# Altium PCB DC Load Control Board.PcbDoc (part 1 of 2)
Units mm, origin at the board's own origin, x right, y up, seen from the top; angles counter-clockwise.
Board outline 70 x 74.5 mm, 4 copper layers (Top Layer, Layer 1, Layer 2, Bottom Layer), stack 0.603 mm thick; 93 components, 78 nets, 360 pads, 209 vias.
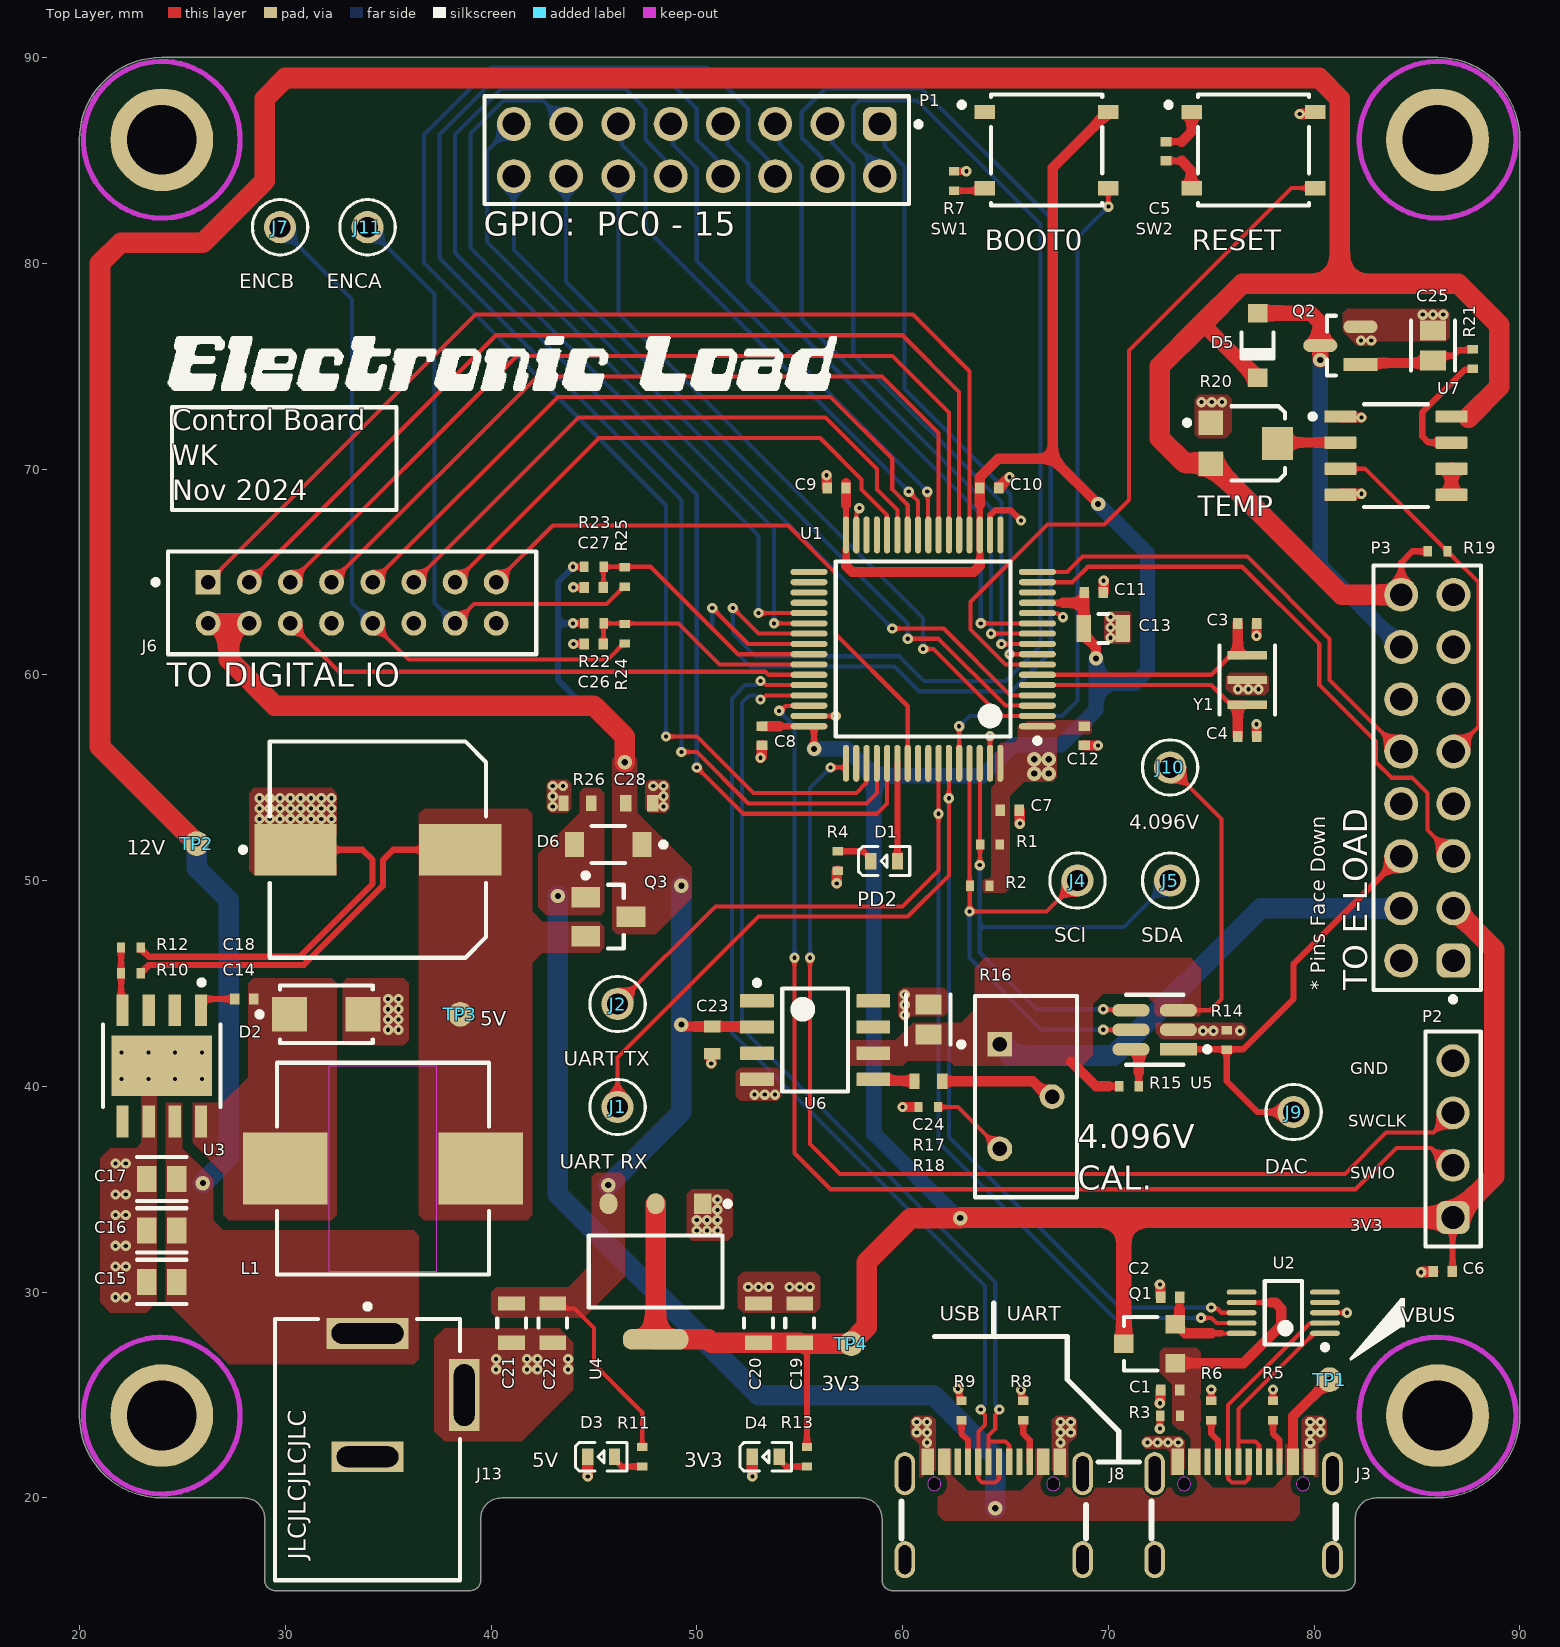
[diagram p0: Top Layer view]
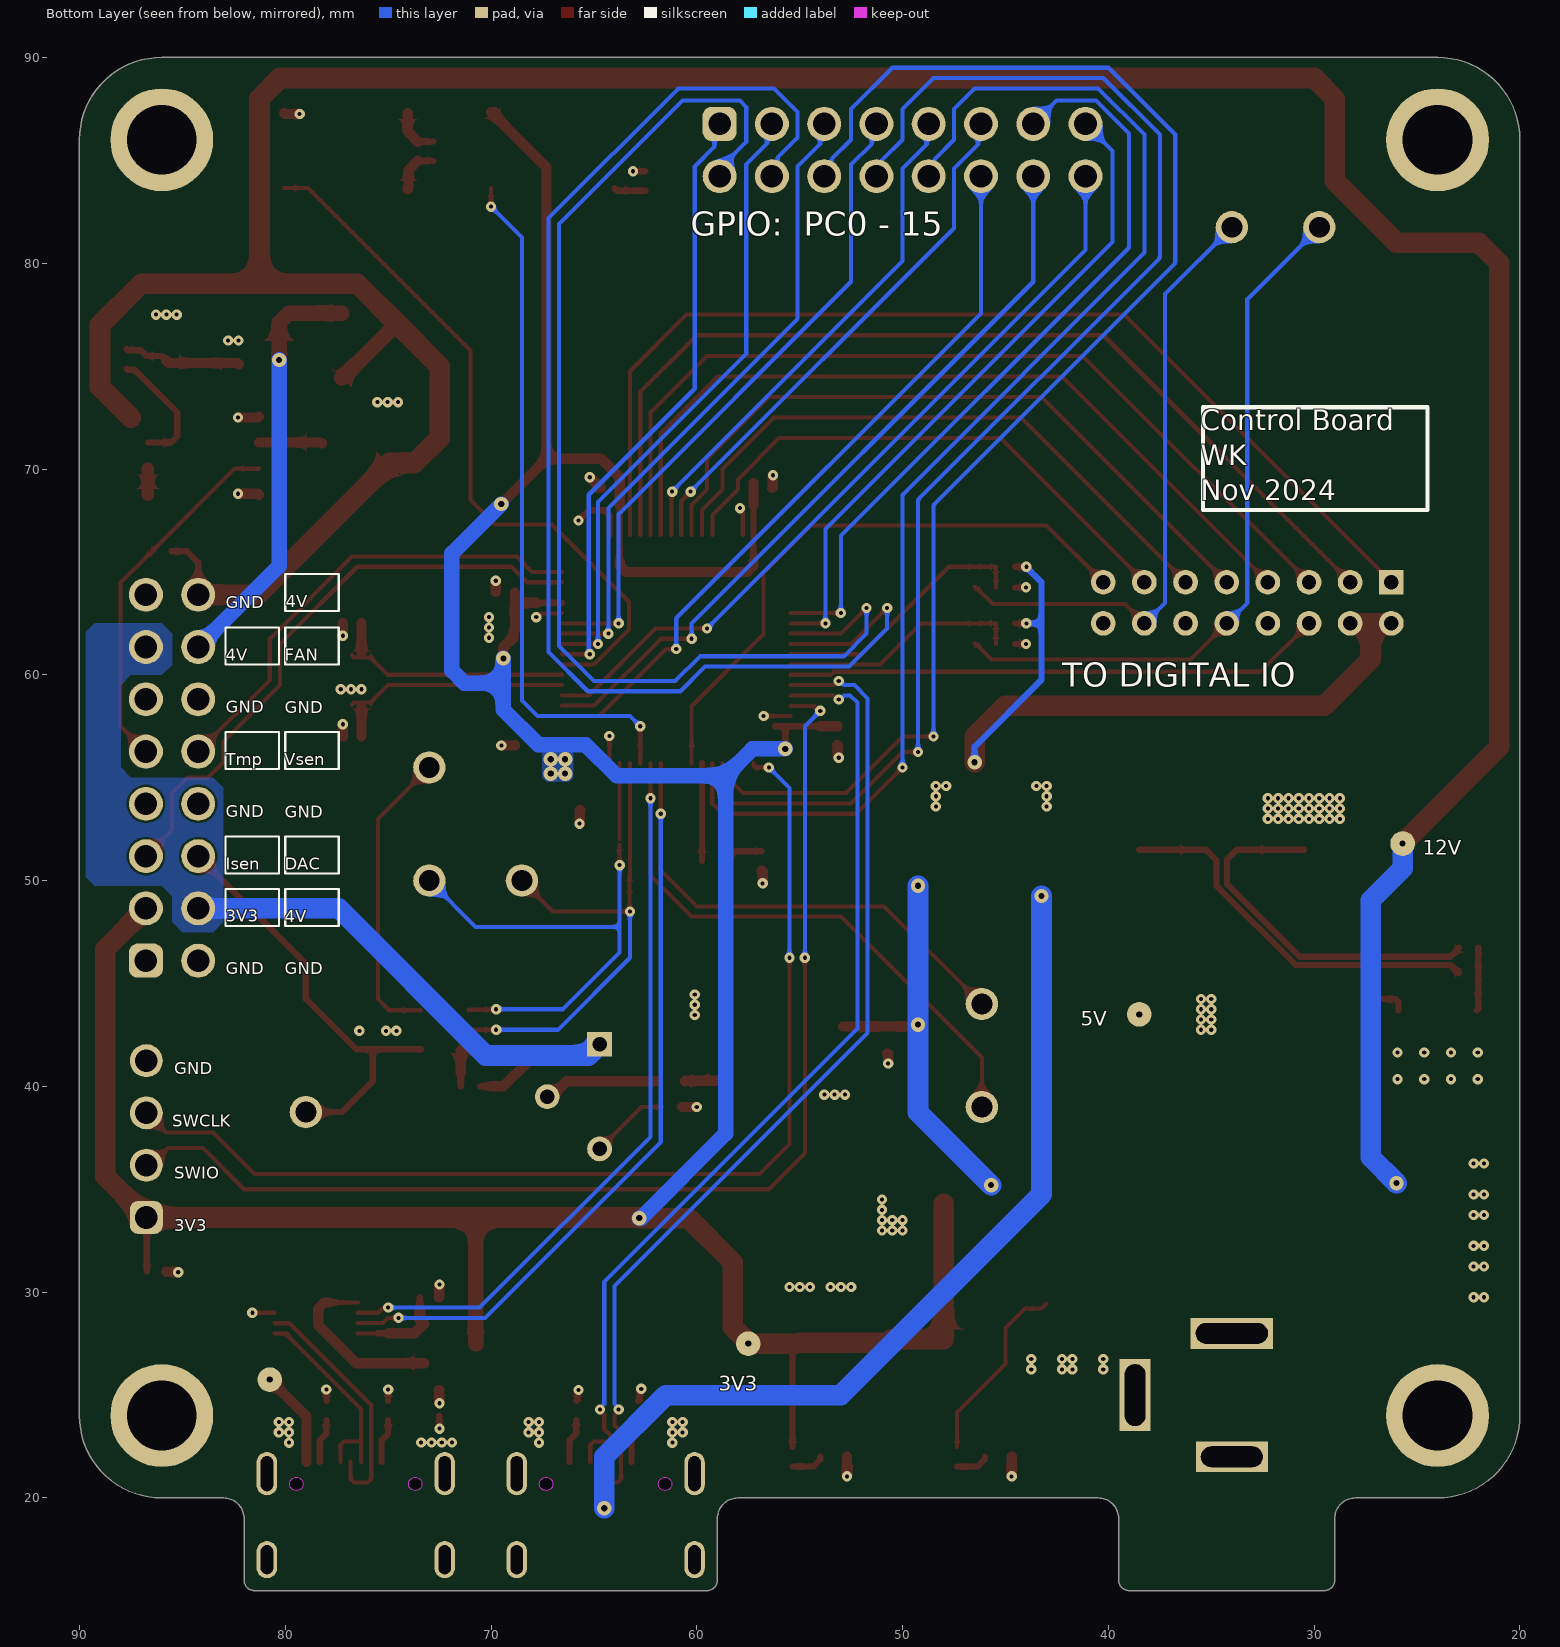
[diagram p1: Bottom Layer view, seen from below]
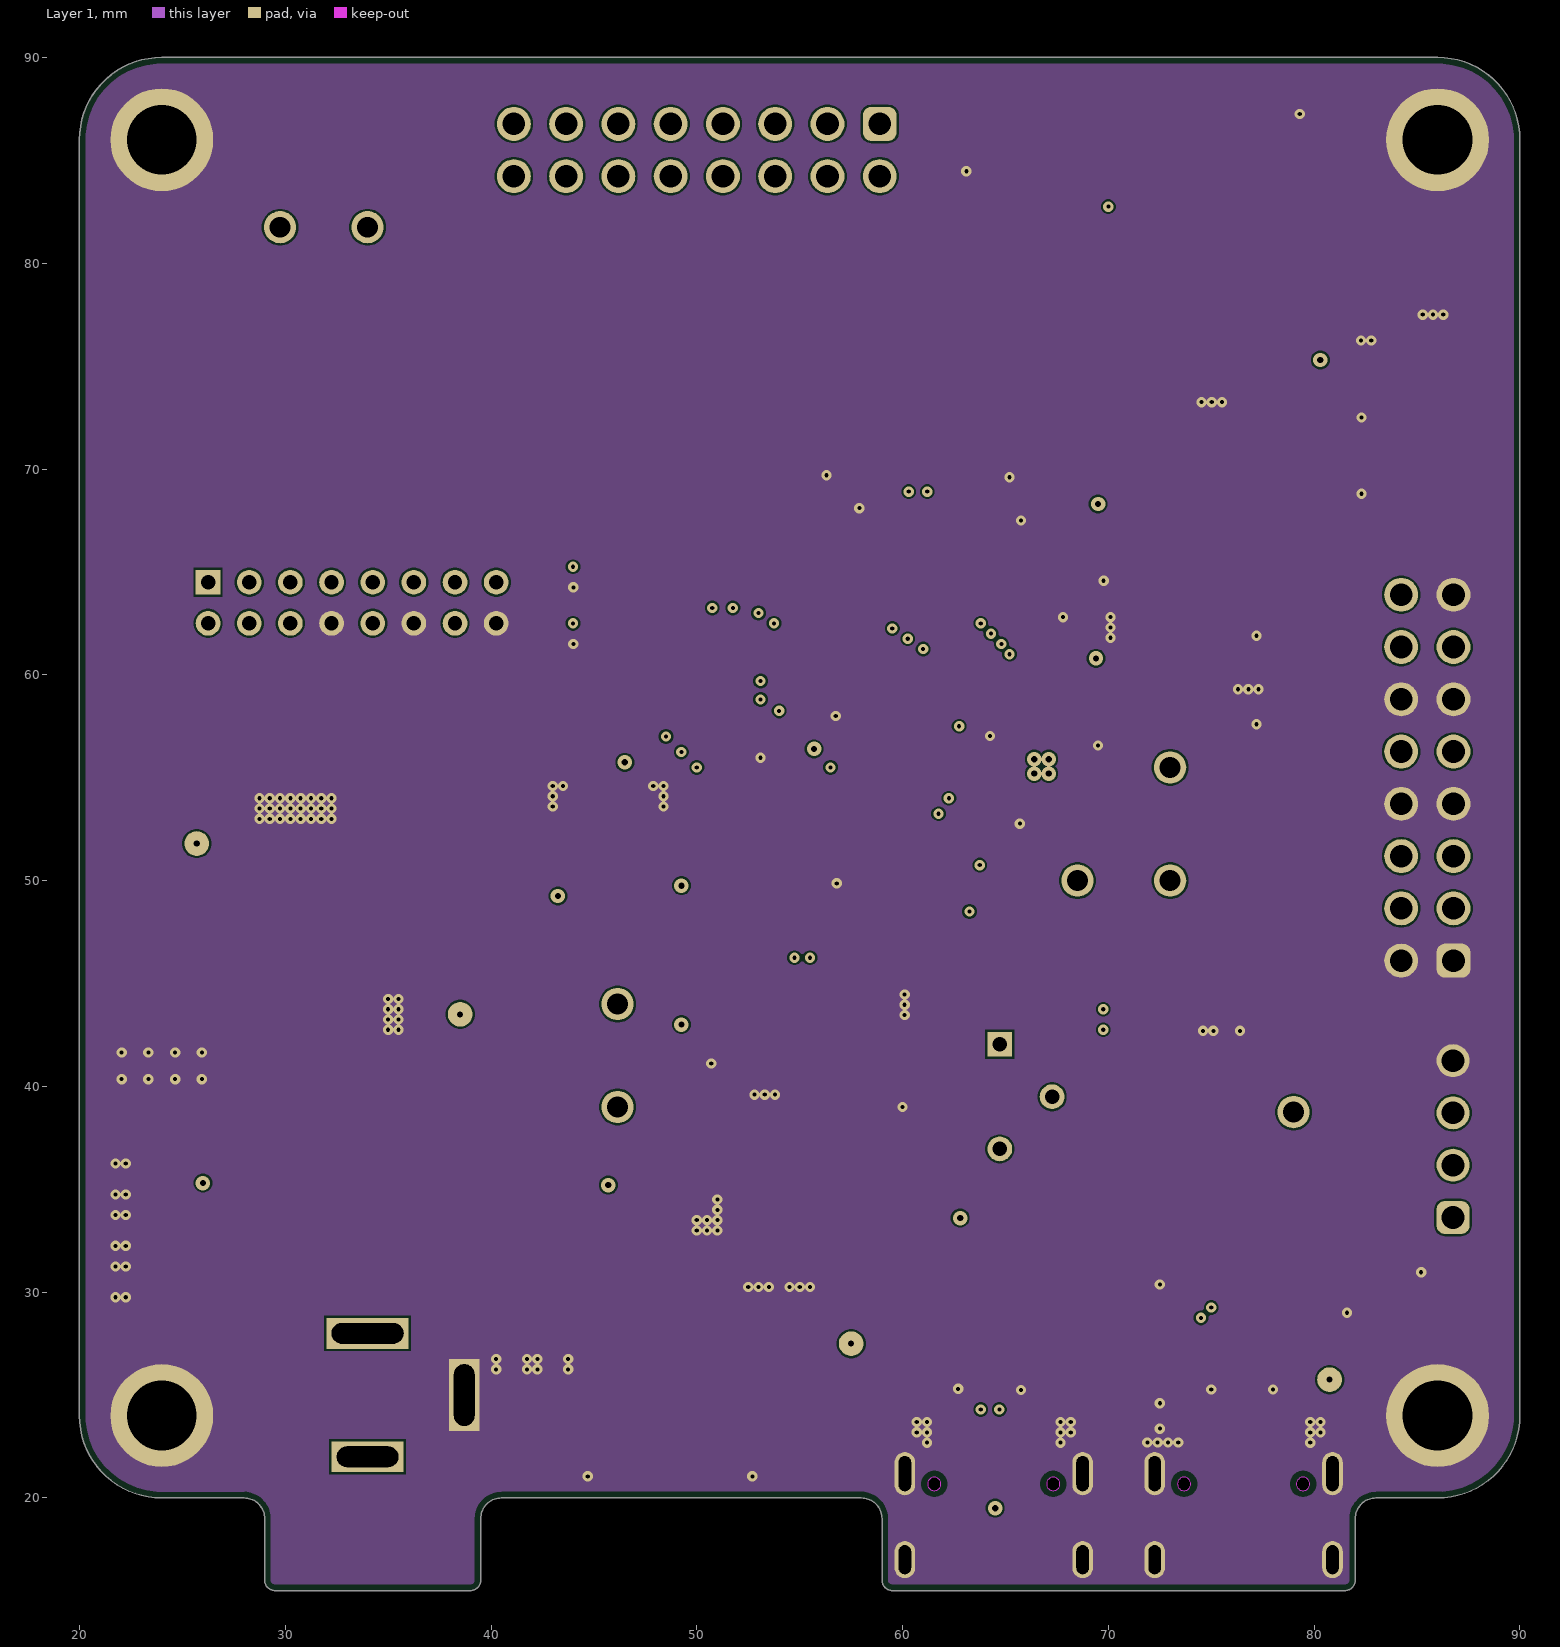
[diagram p2: Layer 1]
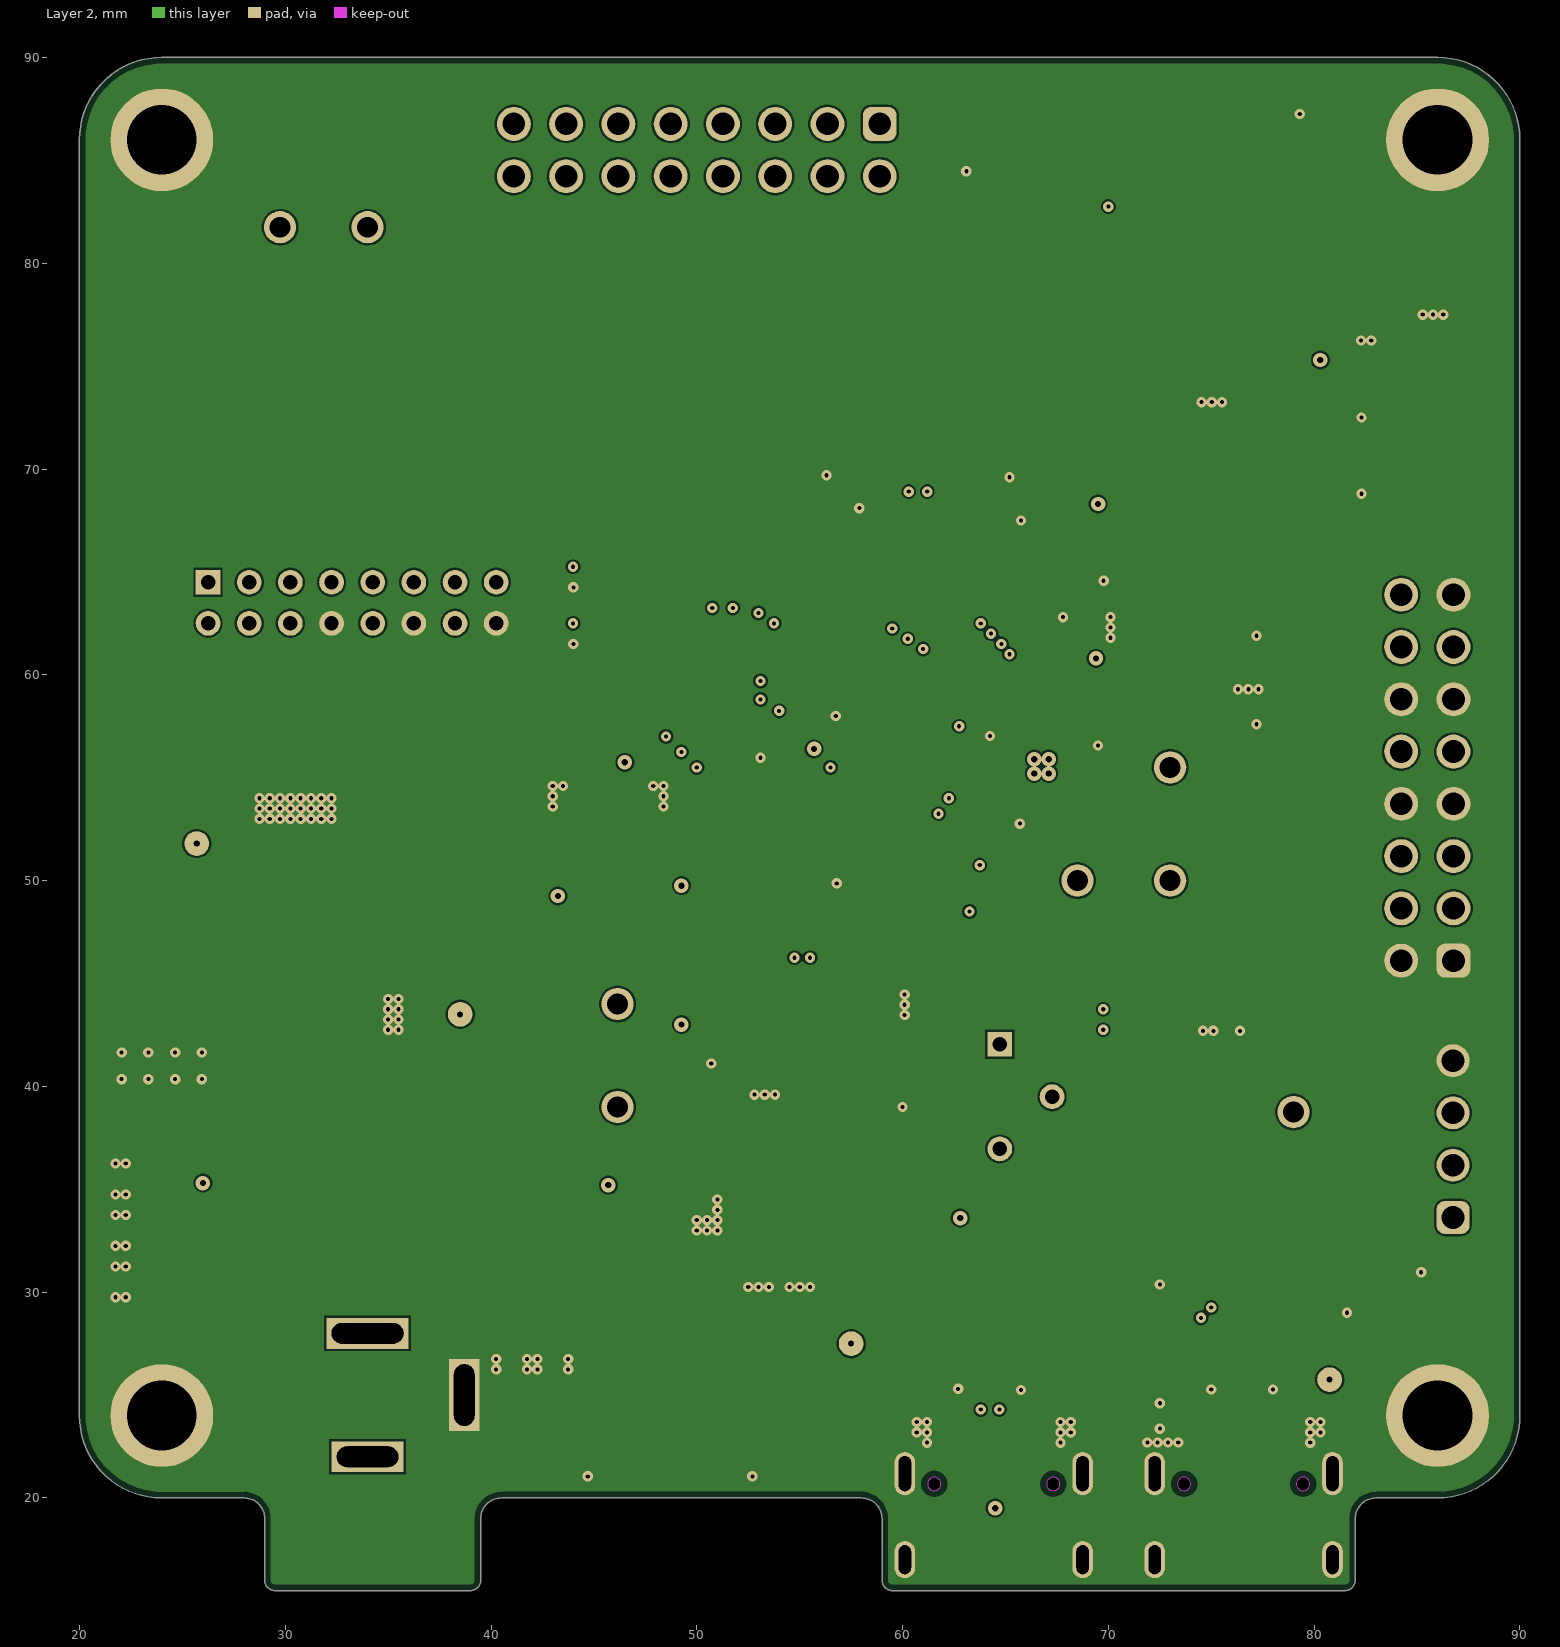
[diagram p3: Layer 2]

## Layer stack, top to bottom
Top Solder: solder mask 0.0102, Solder Resist, Dk 3.5
Top Layer: signal copper 0.0356
Dielectric 2: prepreg 0.0711, PP-006, Dk 4.1
Layer 1: signal copper 0.035
Dielectric 1: dielectric 0.32, FR-4, Dk 4.8
Layer 2: signal copper 0.035
Dielectric 3: prepreg 0.0711, PP-006, Dk 4.1
Bottom Layer: signal copper 0.0356
Bottom Solder: solder mask 0.0102, Solder Resist, Dk 3.5

## Board outline
29,19 29,16 ccw(c29.5,16) 29.5,15.5 39,15.5 ccw(c39,16) 39.5,16 39.5,19 cw(c40.5,19) 40.5,20 58,20 cw(c58,19) 59,19 59,16 ccw(c59.5,16) 59.5,15.5 81.5,15.5 ccw(c81.5,16) 82,16 82,19 cw(c83,19) 83,20 86,20 ccw(c86,24) 90,24 90,86 ccw(c86,86) 86,90 24,90 ccw(c24,86) 20,86 20,24 ccw(c24,24) 24,20 28,20 cw(c28,19)

## Design rules (kind name [scope] priority, off if disabled: settings)
BoardOutlineClearance [All] p1: gap=0.3 ignorepadtopadclearanceinfootprint=FALSE
Clearance [All] p1: gap=0.1 ignorepadtopadclearanceinfootprint=FALSE except(0.3: Fill-Fill Fill-Poly Fill-Region Poly-Poly Poly-Region Region-Region)
DiffPairsRouting [All] p1: maxlimit=0.3 minlimit=0.1 mostfreqgap=0.2 toplayer_minwidth=0.1 toplayer_maxwidth=0.381 toplayer_prefwidth=0.3 midlayer1_minwidth=0.1 midlayer1_maxwidth=0.381 midlayer1_prefwidth=0.3 midlayer2_minwidth=0.1 midlayer2_maxwidth=0.381 midlayer2_prefwidth=0.3 bottomlayer_minwidth=0.1 bottomlayer_maxwidth=0.381 bottomlayer_prefwidth=0.3 maxuncoupledlength=12.7
HoleSize [All] p1: absolutevalues=TRUE maxlimit=5 minlimit=0.025 maxpercent=80.000 minpercent=20.000
MinimumSolderMaskSliver [All] p1: minsoldermaskwidth=0.025
PlaneClearance [All] p1: clearance=0.1
PlaneConnect [All] p1: planeconnectstyle=Direct reliefexpansion=0.508 reliefentries=4 reliefconductorwidth=0.254 reliefairgap=0.254
PolygonConnect [All] p1: connectstyle=Direct reliefconductorwidth=0.254 reliefentries=4 polygonreliefangle="90 Angle" airgapwidth=0.254
RoutingVias [All] p1: holewidth=0.711 width=1.27 viastyle="Through Hole" minholewidth=0.711 minwidth=1.27 maxholewidth=0.711 maxwidth=1.27
SilkToSilkClearance [All] p1: silktosilkclearance=0
SilkToSolderMaskClearance [IsPad] p1: minsilkscreentomaskgap=0.1 clearancetoexposedcopper=TRUE
SolderMaskExpansion [All] p1: expansion=0.102 istentingtop=FALSE
SupplyNets "Schematic Supply Nets_4" [InNet('5V_Sel')] p1: voltage=0.000
SupplyNets "Schematic Supply Nets_6" [InNet('+5 USB')] p2: voltage=0.000
SupplyNets "Schematic Supply Nets_5" [InNet('GND')] p3: voltage=0.000
SupplyNets "Schematic Supply Nets_3" [InNet('+4.096V')] p4: voltage=0.000
SupplyNets "Schematic Supply Nets_2" [InNet('+5V')] p5: voltage=0.000
SupplyNets "Schematic Supply Nets_1" [InNet('+12V')] p6: voltage=0.000
SupplyNets "Schematic Supply Nets" [InNet('+3V3')] p7: voltage=0.000
Width [All] p1: maxlimit=5 minlimit=0.1 preferedwidth=0.2
23 further rules are at their usual default settings.

## Classes and differential pairs
component class Top: J13 P3
component class "U_Digital IO": C26 C27 J6 J7 J11 R22 R23 R24 R25
differential pair class USB2D: USB2D
differential pair class USB1D: USB1D
component class "U_Power Distribution": C14 C15 C16 C17 C18 C19 C20 C21 C22 C28 D2 D3 D4 D6 L1 Q3 R10 R11 R12 R13 R26 TP2 TP3 TP4 U3 U4
component class U_Microcontroller: C1 C2 C3 C4 C5 C6 C7 C8 C9 C10 C11 C12 C13 D1 J1 J2 J3 J4 J5 J8 P1 P2 Q1 R1 R2 R3 R4 R5 R6 R7 R8 R9 SW1 SW2 TP1 U1 U2 Y1
component class U_Thermal: C25 D5 Q2 R19 R20 R21 U7
component class U_DAC: C23 C24 J9 J10 R14 R15 R16 R17 R18 U5 U6
differential pair USB2D: +USB2D_P -USB2D_N
differential pair USB1D: +USB1D_P -USB1D_N

## Components (designator, comment, footprint, x,y, rotation, side; value= is the part's Value field where it differs from the comment)
C1 "100nF" "IPC C C0402 NO SILK" 73,25.25 r180 top
C2 "100nF" "IPC C C0402 NO SILK" 73,29.75 r0 top
C3 "10pF" "IPC C C0402 NO SILK" 76.75,62.5 r180 top
C4 "10pF" "IPC C C0402 NO SILK" 76.75,57 r180 top
C5 "100nF" "IPC C C0402 NO SILK" 72.8,85.45 r270 top
C6 "100nF" "IPC C C0402 NO SILK" 86.25,31 r180 top
C7 "100nF" "IPC C C0402 NO SILK" 65.21,53.42 r0 top
C8 "100nF" "IPC C C0402 NO SILK" 53.17,57.04 r270 top
C9 "100nF" "IPC C C0402 NO SILK" 56.79,69.08 r180 top
C10 "100nF" "IPC C C0402 NO SILK" 64.21,69.08 r0 top
C11 "100nF" "IPC C C0402 NO SILK" 69.29,64 r0 top
C12 "100nF" "IPC C C0402 NO SILK" 68.83,57.04 r270 top
C13 "10uF" FP-GCM21B-0_15-MFG 69.75,62.25 r0 top
C14 "10nF" "IPC C C0402 NO SILK" 28,44.25 r0 top
C15 "10uF" FP-GRM21B-0_1-IPC_C 24,30.5 r180 top
C16 "10uF" FP-GRM21B-0_1-IPC_C 24,33 r180 top
C17 "10uF" FP-GRM21B-0_1-IPC_C 24,35.5 r180 top
C18 "220uF" FP-UCW1H221MNL1GS-MFG 34.5,51.5 r0 top
C19 "22uF" FP-GRM21B-0_15-MFG 55,28.5 r90 top
C20 "22uF" FP-GRM21B-0_15-MFG 53,28.5 r90 top
C21 "22uF" FP-GRM21B-0_15-MFG 41,28.5 r270 top
C22 "22uF" FP-GRM21B-0_15-MFG 43,28.5 r270 top
C23 "1uF" "IPC C C0603 NO SILK" 50.75,42.25 r90 top
C24 "10uF" FP-GRM21B-0_1-IPC_C 61.25,43.25 r90 top
C25 "10uF" FP-GRM21B-0_1-IPC_C 85.775,76 r90 top
C26 "0.01uF" "IPC C C0402 NO SILK" 45,61.5 r180 top
C27 "0.01uF" "IPC C C0402 NO SILK" 45,64.25 r180 top
C28 "10uF" "IPC C C0603 NO SILK" 47.2,53.75 r180 top
D1 "CMP-006-000001-1" "IPC C D0603" 59.1,50.95 r180 top
D2 "SSA34-E3/61T" FP-95400-MFG 32,43.5 r0 top
D3 "Generic LED 0603" "IPC C D0603" 45.35,22 r180 top
D4 "Generic LED 0603" "IPC C D0603" 53.35,22 r180 top
D5 "1N4148W-7-F" DIOD-SOD123-2_V 77.25,76 r270 top
D6 "MBR0540" FP-425-04-MFG 45.7,51.75 r180 top
J1 "5001" FP-5001-MFG 46.15,39 r0 top
J2 "5001" FP-5001-MFG 46.15,44 r0 top
J3 "USB-TYPE-C-019" USB-TYPE-C-12+4P 76.57,19.379 r0 top
J4 "5001" FP-5001-MFG 68.5,50 r0 top
J5 "5001" FP-5001-MFG 73,50 r0 top
J6 "B16B-PHDSS(LF)(SN)" FP-B16B-PHDSS_LF_SN-MFG 33.25,63.5 r180 top
J7 "5001" FP-5001-MFG 29.75,81.75 r0 top
J8 "USB-TYPE-C-019" USB-TYPE-C-12+4P 64.43,19.379 r0 top
J9 "5001" FP-5001-MFG 79,38.75 r0 top
J10 "5001" FP-5001-MFG 73,55.5 r0 top
J11 "5001" FP-5001-MFG 34,81.75 r0 top
J13 "PJ-002A" CUI-PJ-002A_V 34,25 r270 top
L1 "33uH 1040" WE-LHMI_1040 1304.75,1306 r0 top
P1 "61301621121" 61301621121 50,85.5 r180 top
P2 "61300411121" 61300411121 86.75,37.44 r90 top
P3 "61301621121" 61301621121 85.5,55 r90 top
Q1 "AO3400" AO-SOT23-3_V 72,27.5 r90 top
Q2 "MMBT2222A-7-F" FP-SOT23-IPC_A 81.275,76 r180 top
Q3 "FDV304P" FAIR-SOT23-3_V 45.7,48.25 r0 top
R1 "10K" "IPC C R0402 NO SILK" 64.25,51.75 r0 top
R2 "10K" "IPC C R0402 NO SILK" 63.75,49.75 r0 top
R3 "10K" "IPC C R0402 NO SILK" 73,24 r0 top
R4 "1K" "IPC C R0402 NO SILK" 56.85,50.95 r90 top
R5 "5.1K" "IPC C R0402 NO SILK" 78,24.25 r270 top
R6 "5.1K" "IPC C R0402 NO SILK" 75,24.25 r270 top
R7 "10K" "IPC C R0402 NO SILK" 62.5,84 r270 top
R8 "5.1K" "IPC C R0402 NO SILK" 65.86,24.25 r270 top
R9 "5.1K" "IPC C R0402 NO SILK" 62.86,24.25 r270 top
R10 "10K" "IPC C R0402 NO SILK" 22.5,45.5 r0 top
R11 "3.16K" "IPC C R0402 NO SILK" 47.35,22 r90 top
R12 "3.16K" "IPC C R0402 NO SILK" 22.5,46.75 r180 top
R13 "3.16K" "IPC C R0402 NO SILK" 55.35,22 r90 top
R14 "10K" "IPC C R0402 NO SILK" 75.75,42.25 r270 top
R15 "4K7" "IPC C R0402 NO SILK" 71,40 r180 top
R16 "Ref" FP-3296Y-MFG 66,39.5 r180 top
R17 "470K" "IPC C R0603 NO SILK" 61.25,40.25 r0 top
R18 "1K" "IPC C R0402 NO SILK" 61.25,39 r0 top
R19 "470" "IPC C R0402 NO SILK" 86,66 r0 top
R20 "TC33X-2-103E" BOUR-TC33X-2_V 76.775,71.25 r0 top
R21 "470" "IPC C R0402 NO SILK" 87.7,75.35 r90 top
R22 "10K" "IPC C R0402 NO SILK" 45,62.5 r0 top
R23 "10K" "IPC C R0402 NO SILK" 45,65.25 r0 top
R24 "10K" "IPC C R0402 NO SILK" 46.5,62 r270 top
R25 "10K" "IPC C R0402 NO SILK" 46.5,64.75 r270 top
R26 "100K" "IPC C R0603 NO SILK" 44.2,53.75 r0 top
SW1 "C318884" FP-PTS526SK15SMTR2LFS-MFG 67,85.5 r0 top
SW2 "C318884" FP-PTS526SK15SMTR2LFS-MFG 77.05,85.5 r0 top
TP1 "TP1" TP1 80.75,25.75 r90 top
TP2 "TP1" TP1 25.7,51.8 r90 top
TP3 "TP1" TP1 38.5,43.5 r90 top
TP4 "TP1" TP1 57.5,27.5 r90 top
U1 "STM32F103RET6" STM-LQFP64_N 61,61.25 r180 top
U2 "CH340E" MSOP-UN10_L 78.5,29 r180 top
U3 "TPS5430DDA" FP-DDA0008J-MFG 24,41 r270 top
U4 "AMS1117-3.3" FP-AMS1117-IPC_C 48,31 r270 top
U5 "MCP4725A0T-E/CH" FP-C04-028-CHY-IPC_A 72.25,42.75 r180 top
U6 "REF5040AIDR" D0008A_M 55.75,42.25 r0 top
U7 "LM311D" FP-D0008A-MFG 83.975,70.65 r0 top
Y1 "8Mhz, 10pF" FP-CSTNE8M00GH5C000R0-MFG 76.75,59.75 r270 top

## Footprints (in the part's own frame and the unit in brackets; to place one, negate y for a bottom-side part, rotate by r counter-clockwise, add the part's x,y. Pads: shape width x height; smd on the part's side, far side on the other; paste and mask are expansions set on the pad)
61300411121 [mm] "Pin Header, pitch 2.54 mm, THT, Vertical, single row, 4p"
  rrect50% 1.6x1.6 hole 1.1: 1(-3.81,0)
  round 1.6 hole 1.1: 2(-1.27,0) 3(1.27,0) 4(3.81,0)
  silkscreen extent -5.23,-1.35 5.23,1.35, body extent -5.08,-1.27 5.08,1.27, height 8.57
61301621121 [mm] "Pin Header, pitch 2.54 mm, THT, Vertical, dual row, 16p"
  rrect50% 1.65x1.65 hole 1.1: 1(-8.89,-1.27)
  round 1.65 hole 1.1: 2(-8.89,1.27) 3(-6.35,-1.27) 4(-6.35,1.27) 5(-3.81,-1.27) 6(-3.81,1.27) 7(-1.27,-1.27) 8(-1.27,1.27) 9(1.27,-1.27) 10(1.27,1.27) 11(3.81,-1.27) 12(3.81,1.27) 13(6.35,-1.27) 14(6.35,1.27) 15(8.89,-1.27) 16(8.89,1.27)
  silkscreen extent -10.89,-2.62 10.31,2.62, body extent -10.16,-2.54 10.16,2.54, height 8.59
AO-SOT23-3_V [mm] "SOT23, 3-Leads, Body 3.016x2.8mm, Pitch 0.95mm"
  rect 0.9x0.95 smd: 1(-0.95,-1.25) 2(0.95,-1.25) 3(0,1.25)
  silkscreen extent -1.3,-0.38 1.3,1.25, body extent -1.14,-1.25 1.17,1.36, height 1.25
BOUR-TC33X-2_V [mm] "SMD, 3-Leads, Body 3.8x3.6mm"
  rect 1.2x1.2 smd: 1(-1.8,1) 3(-1.8,-1)
  rect 1.5x1.6 smd: 2(1.45,0)
  silkscreen extent -3.07,-1.8 1.8,1.8, body extent -2,-1.8 1.96,1.8, height 1.15
CUI-PJ-002A_V [mm] "THD, 3-Leads, Body 14.4x9mm, Height 11mm"
  rect 1.5x4 hole 1 slot 3.5 at 90 deg: 1(-3,0)
  rect 1.5x3.5 hole 1 slot 3 at 90 deg: 2(3,0)
  rect 3.5x1.5 hole 1 slot 3 at 0 deg: 3(0,4.7)
  silkscreen extent -4.42,-4.5 9,4.5, body extent -3.7,-4.5 10.7,4.9, height 11
D0008A_M [mm] "SOIC, 8-Leads, Body 5x4mm, Pitch 1.27mm, IPC Low Density"
  rrect15% 1.65x0.65 smd: 1(-2.825,1.905) 2(-2.825,0.635) 3(-2.825,-0.635) 4(-2.825,-1.905) 5(2.825,-1.905) 6(2.825,-0.635) 7(2.825,0.635) 8(2.825,1.905)
  silkscreen extent -2.95,-2.5 1.6,2.9, body extent -3,-2.45 3,2.45, height 1.63
DIOD-SOD123-2_V [mm] "SOD123, 2-Leads, Body 2.7x1.55mm, Height 1.45mm"
  rect 0.9x0.95 smd: 1(-1.575,0) 2(1.575,0)
  silkscreen extent -0.64,-0.83 0.64,0.77, body extent -1.35,-0.77 1.35,0.77, height 1.45
FAIR-SOT23-3_V [mm] "SOT23, 3-Leads, Body 3.12x1.5mm, Pitch 0.95mm"
  rect 1.4x1 smd: 1(-1.1,0.95) 2(-1.1,-0.95) 3(1.1,0)
  silkscreen extent -1.22,-1.55 0.75,2.12, body extent -1.35,-1.56 1.35,1.56, height 1.2
FP-425-04-MFG [mil]
  rect 36x48 smd paste+0 mask+0: 1(-64.5,0) 2(64.5,0)
  silkscreen extent -110,-35 32,35, body extent -86,-39 86,39, height 10
FP-3296Y-MFG [mm]
  rect 1.2x1.2 hole 0.7 paste-2539.97 mask+0: 1(1.275,-2.54)
  round 1.2 hole 0.7 paste-2539.97 mask+0: 2(-1.265,0) 3(1.275,2.54)
  silkscreen extent -2.48,-4.89 3.27,4.89, body extent -2.58,-4.99 2.58,4.99, height 0.25
FP-5001-MFG [mm]
  round 1.57 hole 1.016 paste-2539.97 mask+0: 1(0,0)
  silkscreen extent -1.35,-1.34 1.35,1.34, body extent -1.45,-1.45 1.45,1.45, height 0.25
FP-95400-MFG [mm]
  rect 1.7x1.68 smd paste+0 mask+0: 1(-1.79,0) 2(1.79,0)
  silkscreen extent -3.37,-1.4 2.25,1.4, body extent -2.74,-1.5 2.74,1.5, height 0.25
FP-AMS1117-IPC_C [mm]
  rect 1.004x0.872 smd paste+0 mask+0: 1(-3.295,2.29)
  rrect100% 1.004x0.872 smd paste+0 mask+0: 2(-3.295,0) 3(-3.295,-2.29)
  rrect87% 1.004x3.182 smd paste+0 mask+0: 4(3.295,0)
  silkscreen extent -3.42,-3.25 1.75,3.63, body extent -3.9,-3.35 3.9,3.35, height 0.25
FP-B16B-PHDSS_LF_SN-MFG [mm]
  rect 1.2x1.2 hole 0.7 paste-2539.97 mask+0: 1(7,-1)
  round 1.2 hole 0.7 paste-2539.97 mask+0: 2(7,1) 3(5,-1) 4(5,1) 5(3,-1) 6(3,1) 7(1,-1) 8(1,1) 9(-1,-1) 10(-1,1) 11(-3,-1) 12(-3,1) 13(-5,-1) 14(-5,1) 15(-7,-1) 16(-7,1)
  silkscreen extent -8.95,-2.5 9.67,2.5, body extent -9.05,-2.6 9.05,2.6, height 0.25
FP-C04-028-CHY-IPC_A [mm]
  rect 1.805x0.618 smd paste+0 mask+0: 1(-1.15,0.95)
  rrect100% 1.805x0.618 smd paste+0 mask+0: 2(-1.15,0) 3(-1.15,-0.95) 4(1.15,-0.95) 5(1.15,0) 6(1.15,0.95)
  silkscreen extent -2.68,-1.7 1.4,1.7, body extent -2.55,-1.95 2.55,1.95, height 0.25
FP-CSTNE8M00GH5C000R0-MFG [mm]
  rect 0.4x1.9 smd paste+0 mask+0: 1(1.2,0) 2(0,0) 3(-1.2,0)
  silkscreen extent -1.68,-1.35 1.68,1.35, body extent -1.78,-1.05 1.78,1.05, height 0.25
FP-D0008A-MFG [mm]
  rrect17% 1.55x0.6 smd paste+0 mask+0: 1(-2.7,1.905) 2(-2.7,0.635) 3(-2.7,-0.635) 4(-2.7,-1.905) 5(2.7,-1.905) 6(2.7,-0.635) 7(2.7,0.635) 8(2.7,1.905)
  silkscreen extent -4.17,-2.5 1.55,2.5, body extent -3.57,-2.75 3.57,2.75, height 0.25
FP-DDA0008J-MFG [mm]
  rect 1.55x0.6 smd paste+0 mask+0: 1(-2.7,1.905) 2(-2.7,0.635) 3(-2.7,-0.635) 4(-2.7,-1.905) 5(2.7,-1.905) 6(2.7,-0.635) 7(2.7,0.635) 8(2.7,1.905)
  rect 2.95x4.9 smd paste-1000 mask-1000: 9(0,0)
  silkscreen extent -4.17,-2.85 2,2.85, body extent -3.57,-2.75 3.57,2.75, height 0.25
FP-GCM21B-0_15-MFG [mm]
  rect 0.7x1.3 smd paste+0 mask+0: 1(-0.95,0) 2(0.95,0)
  silkscreen extent -0.23,-0.7 0.23,0.7, body extent -1.4,-0.8 1.4,0.8, height 0.25
FP-GRM21B-0_1-IPC_C [mm]
  rect 0.958x1.262 smd paste+0 mask+0: 1(-0.727,0) 2(0.727,0)
  silkscreen extent -1.21,-1.07 1.21,1.07, body extent -1.31,-0.77 1.31,0.77, height 0.25
FP-GRM21B-0_15-MFG [mm]
  rect 0.7x1.3 smd paste+0 mask+0: 1(-0.95,0) 2(0.95,0)
  silkscreen extent -0.23,-0.7 0.23,0.7, body extent -1.4,-0.8 1.4,0.8, height 0.25
FP-PTS526SK15SMTR2LFS-MFG [mm]
  rect 1x0.7 smd paste+0 mask+0: 1(-3,1.85) 2(3,1.85) 3(-3,-1.85) 4(3,-1.85)
  silkscreen extent -4.25,-2.7 2.7,2.7, body extent -3.6,-2.8 3.6,2.8, height 0.25
FP-SOT23-IPC_A [mm]
  rect 1.659x0.627 smd paste+0 mask+0: 1(-0.977,0.915)
  rrect100% 1.659x0.627 smd paste+0 mask+0: 2(-0.977,-0.915) 3(0.977,0)
  silkscreen extent 0.23,-1.45 0.65,1.45, body extent -2.31,-1.95 2.31,1.95, height 0.25
FP-UCW1H221MNL1GS-MFG [mm]
  rect 4x2.5 smd paste+0 mask+0: 1(-4,0) 2(4,0)
  silkscreen extent -6.67,-5.25 5.25,5.25, body extent -6.25,-5.5 6.25,5.5, height 0.25
"IPC C C0402 NO SILK" [mm] "Chip Capacitor, 2-Leads, Body 1.02x0.51mm, IPC High Density"
  rect 0.46x0.54 smd: 1(-0.46,0) 2(0.46,0)
  body extent -0.51,-0.26 0.51,0.25, height 0.51
"IPC C C0603 NO SILK" [mm] "Chip Capacitor, 2-Leads, Body 1.52x0.76mm, IPC High Density"
  rect 0.56x0.8 smd: 1(-0.66,0) 2(0.66,0)
  body extent -0.76,-0.38 0.76,0.38, height 0.77
"IPC C D0603" [mm] "Chip Diode, 2-Leads, Body 1.52x0.76mm, IPC High Density"
  rect 0.55x0.8 smd: 1(-0.65,0) 2(0.65,0)
  silkscreen extent -1.25,-0.7 1.25,0.7, body extent -0.76,-0.38 0.76,0.38, height 0.39
"IPC C R0402 NO SILK" [mm] "Chip Resistor, 2-Leads, Body 1.02x0.51mm, IPC High Density"
  rect 0.4x0.5 smd: 1(-0.475,0) 2(0.475,0)
  body extent -0.51,-0.26 0.51,0.26, height 0.26
"IPC C R0603 NO SILK" [mm] "Chip Resistor, 2-Leads, Body 1.52x0.76mm, IPC High Density"
  rect 0.5x0.75 smd: 1(-0.675,0) 2(0.675,0)
  body extent -0.76,-0.38 0.76,0.38, height 0.39
MSOP-UN10_L [mm] "TSSOP, 10-Leads, Body 3x3mm, Pitch 0.5mm, IPC High Density"
  oval 1.45x0.25 smd: 1(-2.025,1) 2(-2.025,0.5) 3(-2.025,0) 4(-2.025,-0.5) 5(-2.025,-1) 6(2.025,-1) 7(2.025,-0.5) 8(2.025,0) 9(2.025,0.5) 10(2.025,1)
  silkscreen extent -2.15,-1.55 0.9,1.8, body extent -1.55,-1.55 1.55,1.55, height 1.1
STM-LQFP64_N [mm] "Thin QFP, 64-Leads, Body 10x10mm, Pitch 0.5mm, IPC Medium Density"
  oval 1.8x0.3 smd: 1(-5.55,3.75) 2(-5.55,3.25) 3(-5.55,2.75) 4(-5.55,2.25) 5(-5.55,1.75) 6(-5.55,1.25) 7(-5.55,0.75) 8(-5.55,0.25) 9(-5.55,-0.25) 10(-5.55,-0.75) 11(-5.55,-1.25) 12(-5.55,-1.75) 13(-5.55,-2.25) 14(-5.55,-2.75) 15(-5.55,-3.25) 16(-5.55,-3.75) 33(5.55,-3.75) 34(5.55,-3.25) 35(5.55,-2.75) 36(5.55,-2.25) 37(5.55,-1.75) 38(5.55,-1.25) 39(5.55,-0.75) 40(5.55,-0.25) 41(5.55,0.25) 42(5.55,0.75) 43(5.55,1.25) 44(5.55,1.75) 45(5.55,2.25) 46(5.55,2.75) 47(5.55,3.25) 48(5.55,3.75)
  oval 0.3x1.8 smd: 17(-3.75,-5.55) 18(-3.25,-5.55) 19(-2.75,-5.55) 20(-2.25,-5.55) 21(-1.75,-5.55) 22(-1.25,-5.55) 23(-0.75,-5.55) 24(-0.25,-5.55) 25(0.25,-5.55) 26(0.75,-5.55) 27(1.25,-5.55) 28(1.75,-5.55) 29(2.25,-5.55) 30(2.75,-5.55) 31(3.25,-5.55) 32(3.75,-5.55) 49(3.75,5.55) 50(3.25,5.55) 51(2.75,5.55) 52(2.25,5.55) 53(1.75,5.55) 54(1.25,5.55) 55(0.75,5.55) 56(0.25,5.55) 57(-0.25,5.55) 58(-0.75,5.55) 59(-1.25,5.55) 60(-1.75,5.55) 61(-2.25,5.55) 62(-2.75,5.55) 63(-3.25,5.55) 64(-3.75,5.55)
  silkscreen extent -5.68,-4.25 4.25,4.57, body extent -5,-5 5,5, height 1.6
TP1 [mm]
  round 1.2 hole 0.3: 1(0,0)
USB-TYPE-C-12+4P [mm]
  oval 1x2.1 hole 0.6 slot 1.7 at 90 deg mask+0.05: 1(-4.32,1.801) 2(4.32,1.801)
  oval 1x1.8 hole 0.6 slot 1.4 at 90 deg mask+0.05: 3(-4.32,-2.379) 4(4.32,-2.379)
  round 0 hole 0.65 unplated: 6(-2.89,1.302) 7(2.89,1.301)
  rect 0.6x1.3 smd mask+0.05: A1B12(-3.2,2.379) A4B9(-2.4,2.379) B1A12(3.2,2.379) B4A9(2.4,2.379)
  rect 0.3x1.3 smd mask+0.05: A5(-1.25,2.379) A6(-0.25,2.379) A7(0.25,2.379) A8(1.25,2.379) B5(1.75,2.379) B6(0.75,2.379) B7(-0.75,2.379) B8(-1.75,2.379)
  Keep-Out Layer board cut-out: 3.215,1.301 3.183,1.442 3.093,1.555 2.962,1.618 2.818,1.618 2.687,1.555 2.597,1.442 2.565,1.301 2.565,1.301 2.597,1.16 2.687,1.047 2.818,0.984 2.962,0.984 3.093,1.047 3.183,1.16 3.215,1.301
  Keep-Out Layer board cut-out: -2.565,1.302 -2.597,1.443 -2.687,1.556 -2.818,1.619 -2.962,1.619 -3.093,1.556 -3.183,1.443 -3.215,1.302 -3.215,1.302 -3.183,1.161 -3.093,1.048 -2.962,0.985 -2.818,0.985 -2.687,1.048 -2.597,1.161 -2.565,1.302
  silkscreen extent -4.48,-1.34 4.48,0.44, body extent -4.47,-4.95 4.47,2.95, height 3.23
WE-LHMI_1040 [mm] "SMT Power Inductor, 2-Leads, body 10x10mm"
  rect 4.1x3.5 smd: 1(-1274.75,-1270) 2(-1265.25,-1270)
  Top Layer keep-out region: -1272.6,-1265 -1267.4,-1265 -1267.4,-1275 -1272.6,-1275
  silkscreen extent -1275.15,-1275.15 -1264.85,-1264.85, body extent -1275.5,-1275 -1264.5,-1265, height 3.8

## Part data
C1 C2 C3 C4 C5 C6 C7 C8 C9 C10 C11 C12 C14 C26 C27: library part CMP-002-000000-1, Design Item ID="Generic CAP 0402", Source=Schlib1.SchLib
C13: library part CMP-06035-012904-1, "Ceramic Capacitor for Automotive 10uF ±10% 6.3VDC X7R 0805 Embossed T/R GCM21BR70J106KE22K", Case/Package=0805, Dielectric=X7R, Max Operating Temperature=125°C, Min Operating Temperature=-55°C, Tolerance=10%, Voltage Rating (DC)=6.3V, Depth=1.25mm, Lead Free="Lead Free", Length=2mm, Packaging="Tape and Reel"
C15 C16 C17 C24 C25: library part CMP-2007-03453-2, "GRM21BR61C106KE15L; Chip Multilayer Ceramic Capacitors for General Purpose, 0805, 10uF, X5R, 15%, 10%, 16V", Case Code (Imperial)=0805, Case Code (Metric)=2012, Dielectric=X5R, Max Operating Temperature=85°C, Min Operating Temperature=-55°C, Package Quantity=1, Tolerance=10%, Voltage=16V, Capacitance=10uF, Case/Package=0805, Depth=1.25mm, Height=1.25mm, Lead Free="Lead Free", Length=2mm, Material=Ceramic, Mount="Surface Mount", Packaging="Tape and Reel", Radiation Hardening=No, REACH SVHC="No SVHC", Termination=SMD/SMT, Thickness=0.053inch, Voltage Rating=16V, Voltage Rating (DC)=16V, Width=1.25mm
C18: library part CMP-12462-000041-1, "UCW1H221MNL1GS; CAP ALUM 220UF 20% 50V SMD", Case/Package=Radial, Dielectric Material=Aluminium, Leakage Current=3uA, Max Operating Temperature=105°C, Min Operating Temperature=-25°C, Package Quantity=500, Ripple Current=670mA, Tolerance=20%, Voltage=50V, Capacitance=220uF, Construction=Cylindrical, Diameter=10mm, Dissipation Factor=0.14%, Features="General Purpose", Height=10mm, Height - Seated (Max)=0.394inch, Impedance=350mR, Length=10mm, Life (Hours)=7000Hour, Mount="Surface Mount", Packaging="Tape and Reel", Radiation Hardening=No, REACH SVHC="No SVHC", Ripple Current (AC)=670mA, RoHS Compliant=Yes, Series=CW, Termination=SMD/SMT, Voltage Rating=50V, Voltage Rating (DC)=50V, Width=10.3mm
C19 C20 C21 C22: library part CMP-2007-03385-2, "GRM21BR60J226ME39L; Chip Multilayer Ceramic Capacitors for General Purpose, 0805, 22uF, X5R, 15%, 20%, 6.3V", Case Code (Imperial)=0805, Case Code (Metric)=2012, Dielectric=X5R, Max Operating Temperature=85°C, Min Operating Temperature=-55°C, Package Quantity=1, Tolerance=20%, Voltage=6.3V, Capacitance=22uF, Case/Package=0805, Depth=1.25mm, Height=1.25mm, Lead Free="Lead Free", Length=2mm, Material=Ceramic, Mount="Surface Mount", Packaging="Tape and Reel", Radiation Hardening=No, REACH SVHC="No SVHC", Termination=SMD/SMT, Thickness=0.053inch, Voltage Rating=6.3V, Voltage Rating (DC)=6.3V, Width=0.049inch
C23 C28: library part CMP-002-000001-1, Design Item ID="Generic CAP 0603", Source=Schlib1.SchLib
D2: library part CMP-02539-000022-2, "DIODE SCHOTTKY 40V 3A DO214AC", Average Rectified Current=3A, Case/Package=SMA, Forward Voltage=490mV, Max Forward Surge Current (Ifsm)=75A, Max Operating Temperature=150°C, Max Repetitive Reverse Voltage (Vrrm)=40V, Max Reverse Current=200uA, Min Operating Temperature=-65°C, Package Quantity=1, Contact Plating=Tin, Current Rating=3A, Element Configuration=Single, Forward Current=3A, Height=2.087mm, Lead Free="Lead Free", Length=4.5mm, Max Reverse Leakage Current=200uA, Max Reverse Voltage (DC)=40V, Max Surge Current=75A, Mount="Surface Mount", Number of Pins=2, Output Current=3A, Packaging="Tape and Reel", Peak Non-Repetitive Surge Current=75A, Polarity=Standard, Radiation Hardening=No, RoHS Compliant=Yes, Voltage Rating (DC)=40V, Width=2.79mm
D3 D4: library part CMP-006-000001-1, Design Item ID="Generic LED 0603", Source=Schlib1.SchLib
D5: library part CMP-2000-04932-2, "Fast Switching Diode, 100 V, 0.15 A, -65 to 150 degC, 2-Pin?SOD123, RoHS, Tape and Reel", If - Forward Current=0.15A, Ir - Reverse Current=1uA, Manufacturer=DiodesIncorporated, Max Surge Current=2A, Maximum Operating Temperature=+150C, Minimum Operating Temperature=-65C, Operating Temperature Range=-65Cto+150C, Package / Case=SOD-123, Package Reference=SOD123-2, Peak Reverse Voltage=100V, Vf - Forward Voltage=1.25V, Brand=DiodesIncorporated, Configuration=Single, Datasheet URL=http://www.farnell.com/datasheets/1915529.pdf, Datasheet Version="Rev. 24-2, 10/2013", Factory Pack Quantity=3000, Height=1.25mm, Length=2.85mm, Manufacturer URL=http://www.diodes.com/, Mounting Style=SMD/SMT, Package URL=http://www.diodes.com/datasheets/ds18004.pdf, Packaging=Reel, Product=SwitchingDiodes, Product Category=Diodes-GeneralPurpose,Power,Switching, Recovery Time=4ns, RoHS=True, Series=1N4148, Type=SwitchingDiode, Unit Weight=0.000353oz, Width=1.7mm
D6: library part CMP-2000-05114-2, "DIODE SCHOTTKY 40V 500MA SOD123", Average Rectified Current=500mA, Current Rating=500A, Forward Voltage=620mV, Max Forward Surge Current (Ifsm)=5.5A, Max Operating Temperature=125°C, Max Repetitive Reverse Voltage (Vrrm)=40V, Max Reverse Leakage Current=20uA, Min Operating Temperature=-65°C, Package Quantity=3000, Power Dissipation=400mW, Contact Plating=Tin, Element Configuration=Single, Forward Current=500mA, Height=1.03mm, Lead Free="Lead Free", Length=2.7mm, Max Reverse Voltage (DC)=40V, Max Surge Current=5.5A, Mount="Surface Mount", Number of Pins=2, Output Current=500mA, Packaging="Tape and Reel", Peak Non-Repetitive Surge Current=5.5A, Peak Reverse Current=20uA, Polarity=Standard, Radiation Hardening=No, REACH SVHC="No SVHC", Voltage Rating (DC)=40V, Weight=0.03g, Width=1.6mm
J1 J2 J4 J5 J7 J9 J10 J11: library part CMP-2000-05181-2, "PC TEST POINT MINIATURE BLACK", Color=Black, Flammability Rating="UL94 V-0", Package Quantity=100, Body Material=Bronze, Contact Material=Bronze, Contact Plating=Silver, Diameter=2.54mm, Height=0.3inch, Hole Diameter=1.6mm, Housing Color=Black, Inside Diameter=1.27mm, Insulation=Insulated, Insulation Material=Nylon, Lead Free="Lead Free", Length=7.62mm, Material=Nylon, Mount="Through Hole", Number of Contacts=1, Number of Ports=1, Orientation=Straight, Outside Diameter=2.54mm, Packaging=Bulk, Plating=Silver, REACH SVHC="No SVHC", RoHS Compliant=Yes, Series=THM, Termination="Through Hole"
J3 J8: library part CMP-003-000000-1, "Connector Type:Type-C Standard:- Gender:Female Number of Contacts:16 Number of Ports:1 Mounting Style:Surface Mount Current Rating - Power (Max):3A Operating Temperature Range:-25℃~+85℃ Operating Temperature Range:-25℃~+85℃", Current Rating - Power (Max)=3A, JLCPCB Part Class="Extended Part", LCSC Part Name="Type-C 母座 卧贴", Manufacturer=DEALON(德艺隆), Operating Temperature Range=-25℃~+85℃, Add into BOM=yes, Connector Type=Type-C, Convert to PCB=yes, Datasheet=https://atta.szlcsc.com/upload/public/pdf/source/20211217/CCD3D517E355E8E0CC52ABD8D5784AD8.pdf, Design Item ID=USB-TYPE-C-019, Device=USB-TYPE-C-019, Gender=Female, Manufacturer Part=USB-TYPE-C-019, Mounting Style="Surface Mount", Number of Contacts=16, Number of Ports=1, Source=Schlib1.SchLib, Standard=-, Supplier Footprint=SMD, Supplier Part=C2927039, Symbol=USB-TYPE-C-019
J6: library part CMP-17439-000399-1, "CONN HEADER VERT 16POS 2MM", Color=Natural, Contact Resistance=20mR, Current Rating=3A, Flammability Rating="UL94 V-0", Housing Color=Beige, Max Operating Temperature=85°C, Max Voltage Rating (AC)=250V, Min Operating Temperature=-25°C, Connector Type=Header, Contact Finish - Mating=TIN, Contact Material="Copper Alloy", Contact Mating Length=0.114inch, Contact Plating=Copper, Contact Shape=Square, Contact Type="Male Pin", Depth=5mm, Fastening Type=Detent, Gender=Male, Height=9.5mm, Housing Material=Polyamide, Insulation Color=Natural, Insulation Material=Nylon, Lead Free="Lead Free", Length=17.9mm, Mated Stacking Heights=8.8mm, Max Current Rating=3A, Mount="Through Hole", Number of Contacts=16, Number of Positions=16, Number of Rows=2, Orientation=Straight, Packaging=Bulk, Pitch=2mm, Row Spacing=0.079inch, Series=PHD, Termination=Solder, Voltage Rating=250V, Width=5mm
J13: library part CMP-2000-06895-2, "Through Hole Right Angle DC Power Jack, 2.5 A, 2 mm Center Pin, 3 Position, -25 to 85 degC, RoHS, Bulk", Current Rating=2.5A, Flammability Rating=UL94V-0, Insulation Resistance=50MOhms, Manufacturer=CUIInc., Operating Temperature Range=-25Cto+85C, Package Description="3-Pin Through Hole Device, Body 14.4 x 9 mm, Height 11 mm", Voltage Rating=24V, Brand=CUI, Connector Type=DCPowerJack, Contact Gender=Male, Contact Material=Copper, Contact Plating=Nickel, Datasheet URL=http://www.cui.com/product/resource/pj-002a.pdf, Datasheet Version="Rev. 1.03, 04/2016", Factory Pack Quantity=500, Housing Material=PolybutyleneTerephthalate(PBT), Inside Contact Diameter=2mm, Manufacturer URL=http://www.cui.com/, Mounting Angle=Right, Mounting Style=ThroughHole, Mounting Technology=ThroughHole, Outside Contact Diameter=6.5mm, Package Reference=PJ-002A, Product=Jacks, Product Category=DCPowerConnectors, RoHS=True, Termination Style=ThroughHole
L1: library part CMP-1353-00014-4, Ambient Temperature Range High=85°C, Ambient Temperature Range Low=-40°C, DC Resistance (DCR)=92mΩ, Inductance=33µH, Inductance Tolerance=20%, Max Operating Temperature=125°C, Saturation Current=3.3A, Height=3.8mm, Length=11mm, Min Operating Temperature=-40°C, NexarPartId=67091305, RoHS=Compliant, Width=10mm
P1 P3: library part CMP-1502-01097-3, Color=Black, Contact Resistance=20mΩ, Current Rating=3A, Max Operating Temperature=105°C, Min Operating Temperature=-40°C, Operating Supply Voltage=250V, Connector Type="Male Pin", Contact Material=Copper, Contact Mating Length=5.9944mm, Contact Plating=Gold, Gender=Male, Height=8.89mm, Lead Pitch=2.54mm, Mount="Through Hole", NexarPartId=32855550, Number of Contacts=16, Number of Pins=16, Number of Positions=16, Number of Rows=2, Orientation=Vertical, Packaging=Bulk, Pitch=2.54mm, REACH SVHC=Unknown, RoHS=Compliant, Row Spacing=2.54mm, Termination=Solder, Voltage Rating=250V
P2: library part CMP-1502-01064-2, Color=Black, Contact Resistance=20mΩ, Current Rating=3A, Max Operating Temperature=105°C, Min Operating Temperature=-40°C, Operating Supply Voltage=250V, Connector Type="Male Pin", Contact Material=Copper, Contact Mating Length=5.9944mm, Contact Plating=Gold, Gender=Male, Height=8.89mm, Lead Free="Lead Free", Lead Pitch=2.54mm, Mount="Through Hole", NexarPartId=32855522, Number of Contacts=4, Number of Pins=4, Number of Positions=4, Number of Rows=1, Orientation=Vertical, Packaging=Bulk, Pitch=2.54mm, REACH SVHC=Unknown, RoHS=Compliant, Termination=Solder, Voltage Rating=250V
Q1: library part CMP-0278-00001-1, "N-channel Enhancement Mode Field-Effect Transistor; 5.8A/30V", Drain-Source Voltage Limit="30 V", Gate-Source Voltage Limit="+/-12 V", Junction Temperature="-55 to 150 degC", Manufacturer="Alpha and Omega", Channel Type=N, ComponentLink1Description="Manufacturer URL", ComponentLink1URL=http://www.aosmd.com/, ComponentLink2Description=Datasheet, ComponentLink2URL=http://www.aosmd.com/res/data_sheets/AO3400.pdf, ComponentLink3Description="Package Specification", ComponentLink3URL=http://www.aosmd.com/res/packaging_information/SOT-23.pdf, DatasheetVersion="Rev.8, 12/2011", Mounting Technology="Surface Mount", PackageDescription="3-Pin SOT23, 3.016 x 2.8 mm Body, 0.95 mm Pitch", PackageReference=SOT23, PartNumber=AO3400, Storage Temperature="-55 to 150 degC"
Q2: library part CMP-1693-00003-4, "TRANS NPN 40V 0.6A SMD SOT23-3", Case/Package=SOT-23, Collector Base Voltage (VCBO)=75V, Collector Emitter Breakdown Voltage=40V, Collector Emitter Saturation Voltage=1V, Continuous Collector Current=600mA, Current=1A, Emitter Base Voltage (VEBO)=6V, Frequency=300MHz, Max Operating Temperature=150°C, Max Power Dissipation=300mW, Min Operating Temperature=-55°C, Package Quantity=3000, Power Dissipation=350mW, Collector Emitter Voltage (VCEO)=40V, Contact Plating=Tin, Current Rating=600mA, Element Configuration=Single, Gain Bandwidth Product=300MHz, Height=1mm, hFE Min=100, Lead Free="Lead Free", Length=3.05mm, Max Breakdown Voltage=40V, Max Collector Current=600mA, Max Frequency=300MHz, Mount="Surface Mount", Number of Elements=1, Number of Pins=3, Packaging="Tape and Reel", Polarity=NPN, Radiation Hardening=No, REACH SVHC="No SVHC", Termination=SMD/SMT, Transition Frequency=300MHz, Voltage=40V, Voltage Rating (DC)=40V, Weight=0.000282oz, Width=1.4mm
Q3: library part CMP-2000-06263-1, "P-Channel Digital FET, -25 V, -0.46 A, 0.35 W, -55 to 150 degC, 3-Pin SOT-23, -55 to 150 degC, RoHS, Tape and Reel", Manufacturer=FairchildSemiconductor, Maximum Continuous Drain Current=0.46A, Maximum Drain Source Voltage=25V, Maximum Gate Source Voltage=8V, Operating Temperature=-55to150°C, Package=3SOT-23, Package Description="3-Pin Small Outline Transistor, Body 2.92 x 1.325 mm, Pitch 0.95 mm", Package Reference=SOT23-3, Package Version="Rev. 12, 03/2016", Category=MOSFET, Channel Mode=Enhancement, Channel Type=P, Datasheet URL=https://www.fairchildsemi.com/datasheets/FD/FDV304P.pdf, Datasheet Version="Rev. E1, 08/1997", Manufacturer URL=https://www.fairchildsemi.com/, Mounting=SurfaceMount, Mounting Technology=SurfaceMount, Package URL=http://www.fairchildsemi.com/dwg/MA/MA03D.pdf, Packaging=Tape&Reel, Rad Hard=No, RDS-on=1100@4.5VmOhm, Typical Fall Time=35ns, Typical Rise Time=8ns, Typical Turn-Off Delay Time=55ns, Typical Turn-On Delay Time=6ns
R1 R2 R3 R4 R5 R6 R7 R8 R9 R14 R15 R18 R19 R21: library part CMP-008-000000-1, Design Item ID="Generic RES 0402", Source=Schlib1.SchLib
R10 R11 R12 R13 R22 R23 R24 R25: library part CMP-008-000000-1, "Generic RES 0402", Design Item ID="Generic RES 0402", Source=Schlib1.SchLib
R16: library part CMP-07234-000015-2, "TRIMMER 10K OHM 0.5W PC PIN TOP", Color=Blue, Insulation Resistance=1GR, Manufacturer Series=3296, Max Operating Temperature=125°C, Max Power Dissipation=500mW, Min Operating Temperature=-55°C, Package Quantity=50, Resistance=10k, Resistance Law=Linear, Resistance Tolerance=10%, Resistor Type=Cermet, Temperature Coefficient=100ppm/°C, Actuator Orientation=Vertical, Actuator Type=SCREW, Depth=4.83mm, Height=0.395inch, Lead Free="Lead Free", Length=9.53mm, Military Standard=Not, Mount=Panel, Number of Pins=3, Number of Terminals/Pins=3, Number of Turns=25, Packaging=Rail/Tube, Power Rating=500mW, Radiation Hardening=No, REACH SVHC="No SVHC", RoHS Compliant=Yes, Series=3296, Taper=Linear, Technology=CERMET, Terminal Finish=Tin, Termination=Pin, Tolerance=10%, Type=Potentiometer, Weight=0.03oz, Width=9.53mm
R17 R26: library part CMP-008-000001-1, Design Item ID="Generic RES 0603", Source=Schlib1.SchLib
R20: library part CMP-2100-03695-1, "Trimming Potentiometer, 10000 Ohm, -40 to 100 degC, 3-Pin SMD, RoHS, Tape and Reel", Case/Package=SMD/SMT, Colour=Silver, Manufacturer=Bourns, Max Operating Temperature=100degC, Max Power Dissipation=100mW, Min Operating Temperature=-40degC, Package Description="3-Pin Surface Mount Device, Body 3.8 x 3.6 mm", Package Quantity=2500, Package Reference=TC33X-2, Resistance=10KOhm, Temperature Coefficient=250ppm/degreesC, Tolerance=25%, Voltage Rating (DC)=50V, Composition=Potentiometer, Contact Plating=Silver, Datasheet URL=http://www.bourns.com/docs/Product-Datasheets/TC33.pdf, Datasheet Version=42583.0, Depth=3.8mm, Height=0.047inch, Lead Free=LeadFree, Length=3mm, Manufacturer URL=http://www.bourns.com/, Military Standard=Not, Mount=SurfaceMount, Number of Turns=1, Packaging=TapeandReel, Power Rating=100mW, Radiation Hardening=No, REACH SVHC=NoSVHC, RoHSCompliant=true, Taper=Linear, Termination=FootPrint, Weight=29.4mg, Width=0.118inch
SW1 SW2: library part CMP-10040-000013-1, "TACT 5.2 X 5.2, 1.5 MM H, 260GF, C318884", Contact Current Rating=50mA, Contact Resistance=100mΩ, Manufacturer=C&K, Manufacturer Part Number=PTS526SK15SMTR2LFS, Operating Force=250gf, Temperature="-20°C to +70°C", Temperature Range High=+70°C, Temperature Range Low=-20°C, Voltage Rating Dc=12V, Automotive=No, Category=Switch, ComponentLink2Description=Datasheet, ComponentLink2URL=https://www.ckswitches.com/media/2780/pts526.pdf, Device Class L1=Electromechanical, Device Class L2=Switches, Device Class L3="Tactile Switches", Digikey Description="TACT 5.2 X 5.2, 1.5 MM H, 260GF,", Electromechanical Life=200000Cycles, Height=1.65mm, Lead Free=Yes, Octopart=https://octopart.com/pts526+sk15+smtr2+lfs-c%26k+components-100617999, Package=PTS526SK15SMTR2LFS, RoHS=TRUE, Standoff Height=0mm, Throw Configuration=SPST-NO
TP1 TP2 TP3 TP4: library part CMP-00003-3, "Testpoint double sided"
U1: library part CMP-0237-00201-3, "ARM Cortex-M3 32-bit MCU, 512 KB Flash, 64 KB Internal RAM, 51 I/Os, 64-pin LQFP, -40 to 85 degC, Tray", I/Os (High Current)=51, Operating Frequency(F) (Processor speed) (MHz)=72, Supply Voltage(Vcc) min (V)=2, A/D Converter="3x12-bit (16 Channel)", ComponentLink1Description="Manufacturer URL", ComponentLink1URL=http://www.st.com/web/en/home.html, ComponentLink2Description=Datasheet, ComponentLink2URL=http://www.st.com/st-web-ui/static/active/en/resource/technical/document/datasheet/CD00191185.pdf, ComponentLink3Description="Package Specification", ComponentLink3URL=http://www.st.com/st-web-ui/static/active/en/resource/technical/document/datasheet/DM00037051.pdf, Core="ARM Cortex-M3", D/A Converter="2x12-bit (2 Channel)", DatasheetVersion="Rev. 8", FLASH Size (Prog) (kB)=512, Internal RAM Size (kB)=64, Mounting Technology="Surface Mount", PackageDescription="64-Pin Low Profile Quad Flat Package, 10 x 10 mm Body, 0.5 mm Pitch", PackageReference=LQFP64, PackageVersion="Rev. 4, 06/2013", Packing=Tray, PartNumber=STM32F103RET6
U2: library part CMP-010-000001-1, Design Item ID=CH340E, Source=Schlib1.SchLib
U3: library part CMP-2000-04960-2, "IC REG BUCK ADJUSTABLE 3A 8SOPWR", Manufacturer="Texas Instruments", Max Junction Temp=+125°C, Max Supply Voltage=36V, Min Supply Voltage=5.5V, Nominal Supply Current=3mA, Output Current=3A, Output Voltage=1.23-31V, Package=DDA0008J, Switching Frequency=500kHz, Temperature="-40°C to +125°C", Temperature Range Low=-40°C, Automotive=No, Category=IC, ComponentLink2Description=Datasheet, ComponentLink2URL=http://www.ti.com/lit/ds/symlink/tps5431.pdf, Device Class L1="Integrated Circuits (ICs)", Device Class L2="Power Management ICs", Device Class L3="Voltage Regulators - Switching", Digikey Description="IC REG BUCK ADJUSTABLE 3A 8SOPWR", Height=1.7mm, Lead Free=Yes, Manufacturer Part Number=TPS5430DDA, Max Duty Cycle=89%, Mouser Description="Voltage Regulators - Switching Regulators 5.5 to 36V Input 3A Step Dwn Converter", Number Of Outputs=1, Octopart=https://octopart.com/tps5430dda-texas+instruments-589977, Output Type=AdjustableProgrammable, RoHS=TRUE, Standoff Height=0mm, Switching Topology=Buck, Temperature Range High=+125°C
U4: library part CMP-209535-000001-1, "LDO Voltage Regulators 1A, 3.3V", Dropout Voltage=1.1V, Manufacturer="Advanced Monolithic Systems", Max Junction Temp=+125°C, Max Power Dissipation=1.2W, Max Supply Voltage=15V, Nominal Supply Current=5mA, Output Current=1A, Output Voltage=3.3V, Package=AMS1117, Temperature="-40°C to +125°C", Temperature Range Low=-40°C, Automotive=No, Category=IC, ComponentLink2Description=Datasheet, ComponentLink2URL=http://www.advanced-monolithic.com/pdf/ds1117.pdf, Device Class L1="Integrated Circuits (ICs)", Device Class L2="Power Management ICs", Device Class L3="Voltage Regulators - Linear", Height=1.8mm, Ipc Land Pattern Name=SOT229P700X180-4, Lead Free=Yes, Manufacturer Part Number=AMS1117-3.3, Number Of Outputs=1, Octopart=https://octopart.com/ams1117-3.3-advanced+monolithic+systems-25899300, Output Type=Fixed, RoHS=TRUE, Standoff Height=0.64mm, Temperature Range High=+125°C
U5: library part CMP-0188-00760-3, "IC DAC 12BIT V-OUT SOT23-6", Case/Package=SOT-23-6, Input Offset Voltage (Vos)=1.1mV, Max Operating Temperature=125°C, Max Supply Voltage=5.5V, Min Operating Temperature=-40°C, Min Supply Voltage=2.7V, Nominal Supply Current=210uA, Package Quantity=3000, Contact Plating=Tin, Height=1.3mm, Integral Nonlinearity (INL)=14.5LSB, Interface=I2C, Lead Free="Lead Free", Length=3.1mm, Mount="Surface Mount", Number of Bits=12, Number of Channels=1, Number of Converters=1, Number of D/A Converters=1, Number of DAC Channels=1, Number Of Outputs=1, Number of Pins=6, Output Type=Voltage, Packaging="Tape and Reel", Polarity=Unipolar, Radiation Hardening=No, REACH SVHC="No SVHC", Resolution=12b, Settling Time=6us, Supply Type=Single, Termination=SMD/SMT, Width=1.8mm
U6: library part CMP-0367-00019-2, "Low Noise, Very Low Drift, Precision Voltage Reference, -40 to 125 degC, 8-pin SOIC (D), Green (RoHS & no Sb/Br)", Manufacturer="Texas Instruments", Rating=Catalog, Temp Coeff(Max)(ppm/ degree C)=3, Code_JEDEC=MS-012, ComponentLink1Description="Manufacturer URL", ComponentLink1URL=http://www.ti.com/, ComponentLink2Description=Datasheet, ComponentLink2URL=http://www.ti.com/general/docs/lit/getliterature.tsp?genericPartNumber=REF5040&fileType=pdf, ComponentLink3Description="Package Specification", ComponentLink3URL=http://www.ti.com/litv/pdf/msoi002j, DatasheetVersion=SBOS410E, Eco-Plan="Green (RoHS & no Sb/Br)", Initial Accuracy @ 25/deg C(%)=0.05, Iout/Iz(Max)(mA)=10, Iq(Max)(uA)=1000, Mounting Technology="Surface Mount", PackageDescription="8-Pin Plastic Small Outline, Body 4.9 x 3.9 mm, Pitch 1.27 mm", PackageReference=D0008A, PackageVersion=4040047-3/M, PartNumber=REF5040AIDR, SubFamily="Series Voltage Reference", VI(Max)(V)=18, VI(Min)(V)=4.296, VO(V)=4.096
U7: library part CMP-04896-000022-1, "IC DIFF COMP W/STROBE 8-SOIC", Ambient Temperature Range High=+70°C, Ambient Temperature Range Low=0°C, Input Bias Current=0.1uA, Input Offset Voltage=2mV, Manufacturer="Texas Instruments", Max Junction Temp=+150°C, Max Supply Voltage=30V, Min Supply Voltage=3.5V, Nominal Supply Current=5.1mA, Package=D0008A, Temperature="0°C to +70°C", Voltage Gain=200V/mV, Automotive=No, Category=IC, ComponentLink2Description=Datasheet, ComponentLink2URL=http://www.ti.com/lit/ds/symlink/lm311.pdf, Device Class L1="Integrated Circuits (ICs)", Device Class L2="Linear ICs", Device Class L3=Comparators, Digikey Description="IC DIFF COMP W/STROBE 8-SOIC", Height=1.75mm, Ipc Land Pattern Name=SOIC127P600X175-8, Lead Free=Yes, Manufacturer Part Number=LM311D, Mouser Description="Analog Comparators Single Channler", Number of Channels=1, Octopart=https://octopart.com/lm311d-texas+instruments-428348, Response Time=165ns, RoHS=TRUE, Standoff Height=0.11mm, Temperature Range High=+70°C, Temperature Range Low=0°C
Y1: library part CMP-06057-000001-1, "MFR.Part # / CSTCE8M00G52-R0 Copy / JLCPCB Part # / C22549 Copy / Package / SMD3213-3P Copy / Description / 8MHz ±0.5% 10pF 40Ω SMD3213-3P Ceramic Resonators ROHS", Capacitance=33pF, Case/Package=SMD/SMT, Frequency=8MHz, Frequency Stability=0.13%, Frequency Tolerance=0.07%, Max Operating Temperature=125°C, Min Operating Temperature=-40°C, Resistor Type=Ceramic, Impedance=40R, Mount="Surface Mount", Packaging="Tape and Reel"
D1: Design Item ID="Generic LED 0603", Source=Schlib1.SchLib

## Free pads (board coordinates)
  round 5 hole 3.4: 11(24,24) 11(24,86) 11(86,24) 11(86,86)

## Via types
v1: diameter 0.5, hole 0.2, Top Layer to Bottom Layer, tented both sides, 185 vias
v2: diameter 0.7, hole 0.3, Top Layer to Bottom Layer, tented both sides, 16 vias
v3: diameter 0.5, hole 0.2, Top Layer to Bottom Layer, 8 vias

## Nets (pads, with @x,y where several pads share a name; then routed paths per layer and width w, separated by ;. In a path a pad name is that pad's centre, name@x,y a point inside that pad or via, vN(x,y) a via of type N, cw(c..) or ccw(c..) an arc to the next point about the centre after c; other vN are vias at no path point)
5V_Sel: C21.1 C22.1 C23.2 C28.2 D6.1 J6.2 J6.4 Q3.3 R11.2 R22.1 R23.1 U4.3 U6.2 | length 67.7
  Top Layer w0.2: C22.1@43,29.45 43.25,29.2 44.05,29.2 45,28.25 45,26.5 47.35,24.15 R11.2@47.35,22.475
  Top Layer w0.3: v1(43.985,62.5) R22.1@44.525,62.5 ; v1(43.985,65.25) R23.1@44.525,65.25
  Top Layer w0.5: v2(49.25,43) 49.304,43 49.394,42.91 U6.2@52.9,42.91
  Top Layer w1: J6.2@26.25,62.5 27.25,62.5 ; J6.4@28.25,62.5 27.25,62.5 ; v2(46.5,55.75) 46.5,57 45,58.5 29.5,58.5 27.25,60.75 27.25,62.5
  Bottom Layer w0.3: v1(43.985,62.5) 43.25,62.5 ; v1(43.985,65.25) 43.985,65.23 43.25,64.495 43.25,62.5 ; v2(46.5,55.75) 46.5,56.5 43.25,59.75 43.25,62.5
  Bottom Layer w1: v2(45.7,35.2) 49.25,38.75 v2(49.25,43) v2(49.25,49.75)
+3V3: C6.1 C7.1 C8.1 C9.1 C10.1 C11.1 C12.1 C13.1 C19.1 C20.1 P2.1 P3.3 Q1.3 R1.2 R2.2 R13.2 SW1.2 TP4.1 U1.1 U1.13 U1.19 U1.32 U1.48 U1.64 U4.2 U4.4 | length 183.6
  Top Layer w0.3: 54,57.5 U1.48@55.45,57.5 U1.48@55.7,57.5 ; C19.1@55,27.55 55.15,27.55 55.2,27.5 55.35,27.35 R13.2@55.35,22.475 ; v2(55.7,56.4) U1.48@55.7,57.5 ; U1.48@56.2,57.5 U1.48@55.7,57.5 ; 57.25,65.5 U1.32@57.25,66.8 57.25,68.25 ; 63.75,65.5 U1.19@63.75,66.8 63.75,68.25 ; U1.13@66.55,63.5 67.8,63.5 ; C6.1@86.71,31 86.73,31.02 86.73,33.61 P2.1@86.75,33.63
  Top Layer w0.5: C8.1@53.17,57.5 54,57.5 ; 57.25,65.5 57.25,65.293 57.543,65 63.457,65 63.75,65.293 63.75,65.5 ; 57.25,68.25 C9.1@57.25,69.08 C9.1@57.25,69.307 ; 63.75,68.25 C10.1@63.75,69.08 63.75,69.6 64.65,70.5 67.3,70.5 ; 67.8,63.5 68.83,63.5 ; C13.1@68.8,62.25 68.9,62.15 68.9,61.85 69.4,61.35 v2(69.4,60.8) ; C13.1@68.83,62.28 68.83,63.5 ; C11.1@68.83,64 68.83,63.5 ; v2(69.5,68.3) 67.3,70.5 ; SW1.2@70,87.35 69.85,87.35 69.75,87.25 69.75,87.1 67.3,84.65 67.3,70.5
  Top Layer w0.75: Q1.3@70.725,27.5 Q1.3@70.75,27.5 70.75,33.63
  Top Layer w1: U4.2@48,34.295 U4.4@48,27.705 50.545,27.705 50.7,27.55 C20.1@53,27.55 C19.1@55,27.55 ; C19.1@55.2,27.5 TP4.1@57.5,27.5 57.5,27.554 58.25,28.304 58.25,31.45 60.4,33.6 v2(62.8,33.6) 62.83,33.63 70.75,33.63 P2.1@86.75,33.63 88.75,35.63 88.75,46.67 P3.3@86.77,48.65
  Bottom Layer w0.75: v2(55.7,56.4) 57.3,56.4 58.6,55.1 ; v2(62.8,33.6) 62.7,33.6 58.6,37.7 58.6,55.1 ; v2(69.4,60.8) 69.4,59.6 ; v2(69.5,68.3) 71.9,65.9 71.9,60.2 71.3,59.6 69.4,59.6 ; 58.6,55.1 63.9,55.1 65.4,56.6 67.7,56.6 69.4,58.3 69.4,59.6
  other v2: 66.4,55.2 67.1,55.2 66.4,55.9 67.1,55.9